# Altium PCB ModuMIDI.PcbDoc (part 1 of 2)
Units mil, origin at the board's own origin, x right, y up, seen from the top; angles counter-clockwise.
Board outline 9987.45 x 7920 mil, 2 copper layers (Top Layer, Bottom Layer), stack 62.19 mil thick; 170 components, 117 nets, 494 pads, 132 vias.
Unrouted connection lines stored in the file: 1.
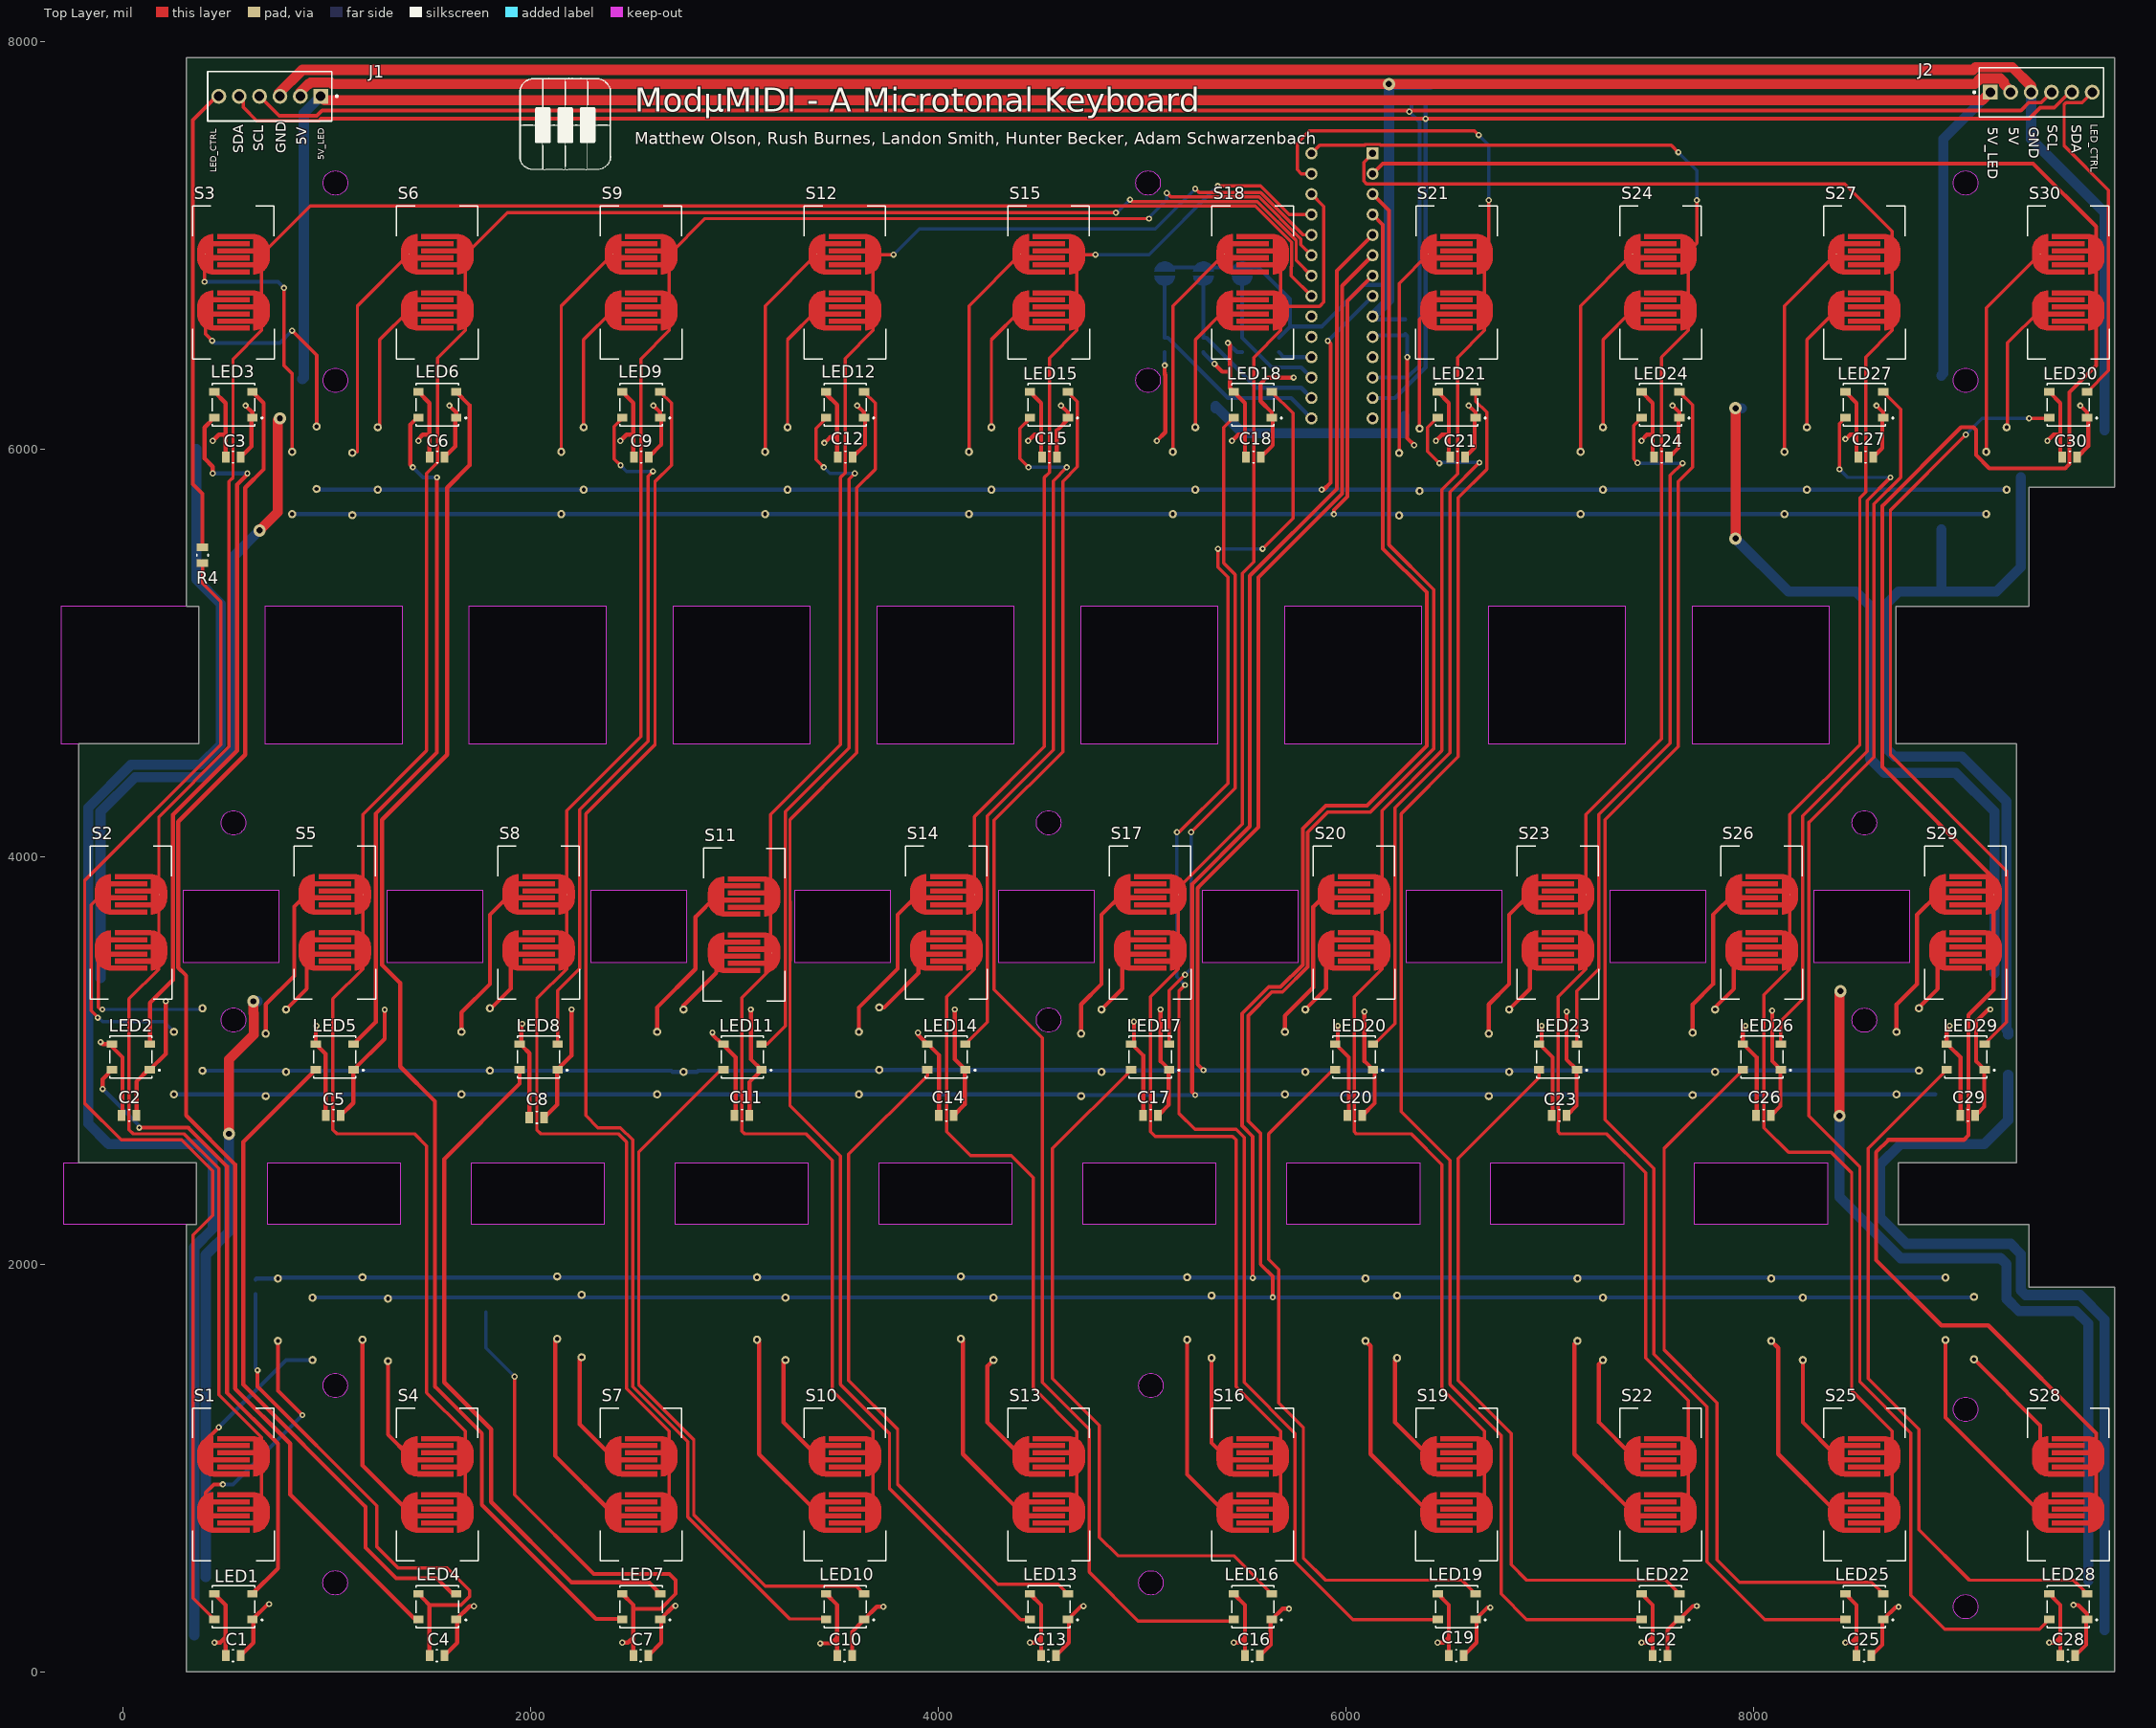
[diagram p0: Top Layer view]
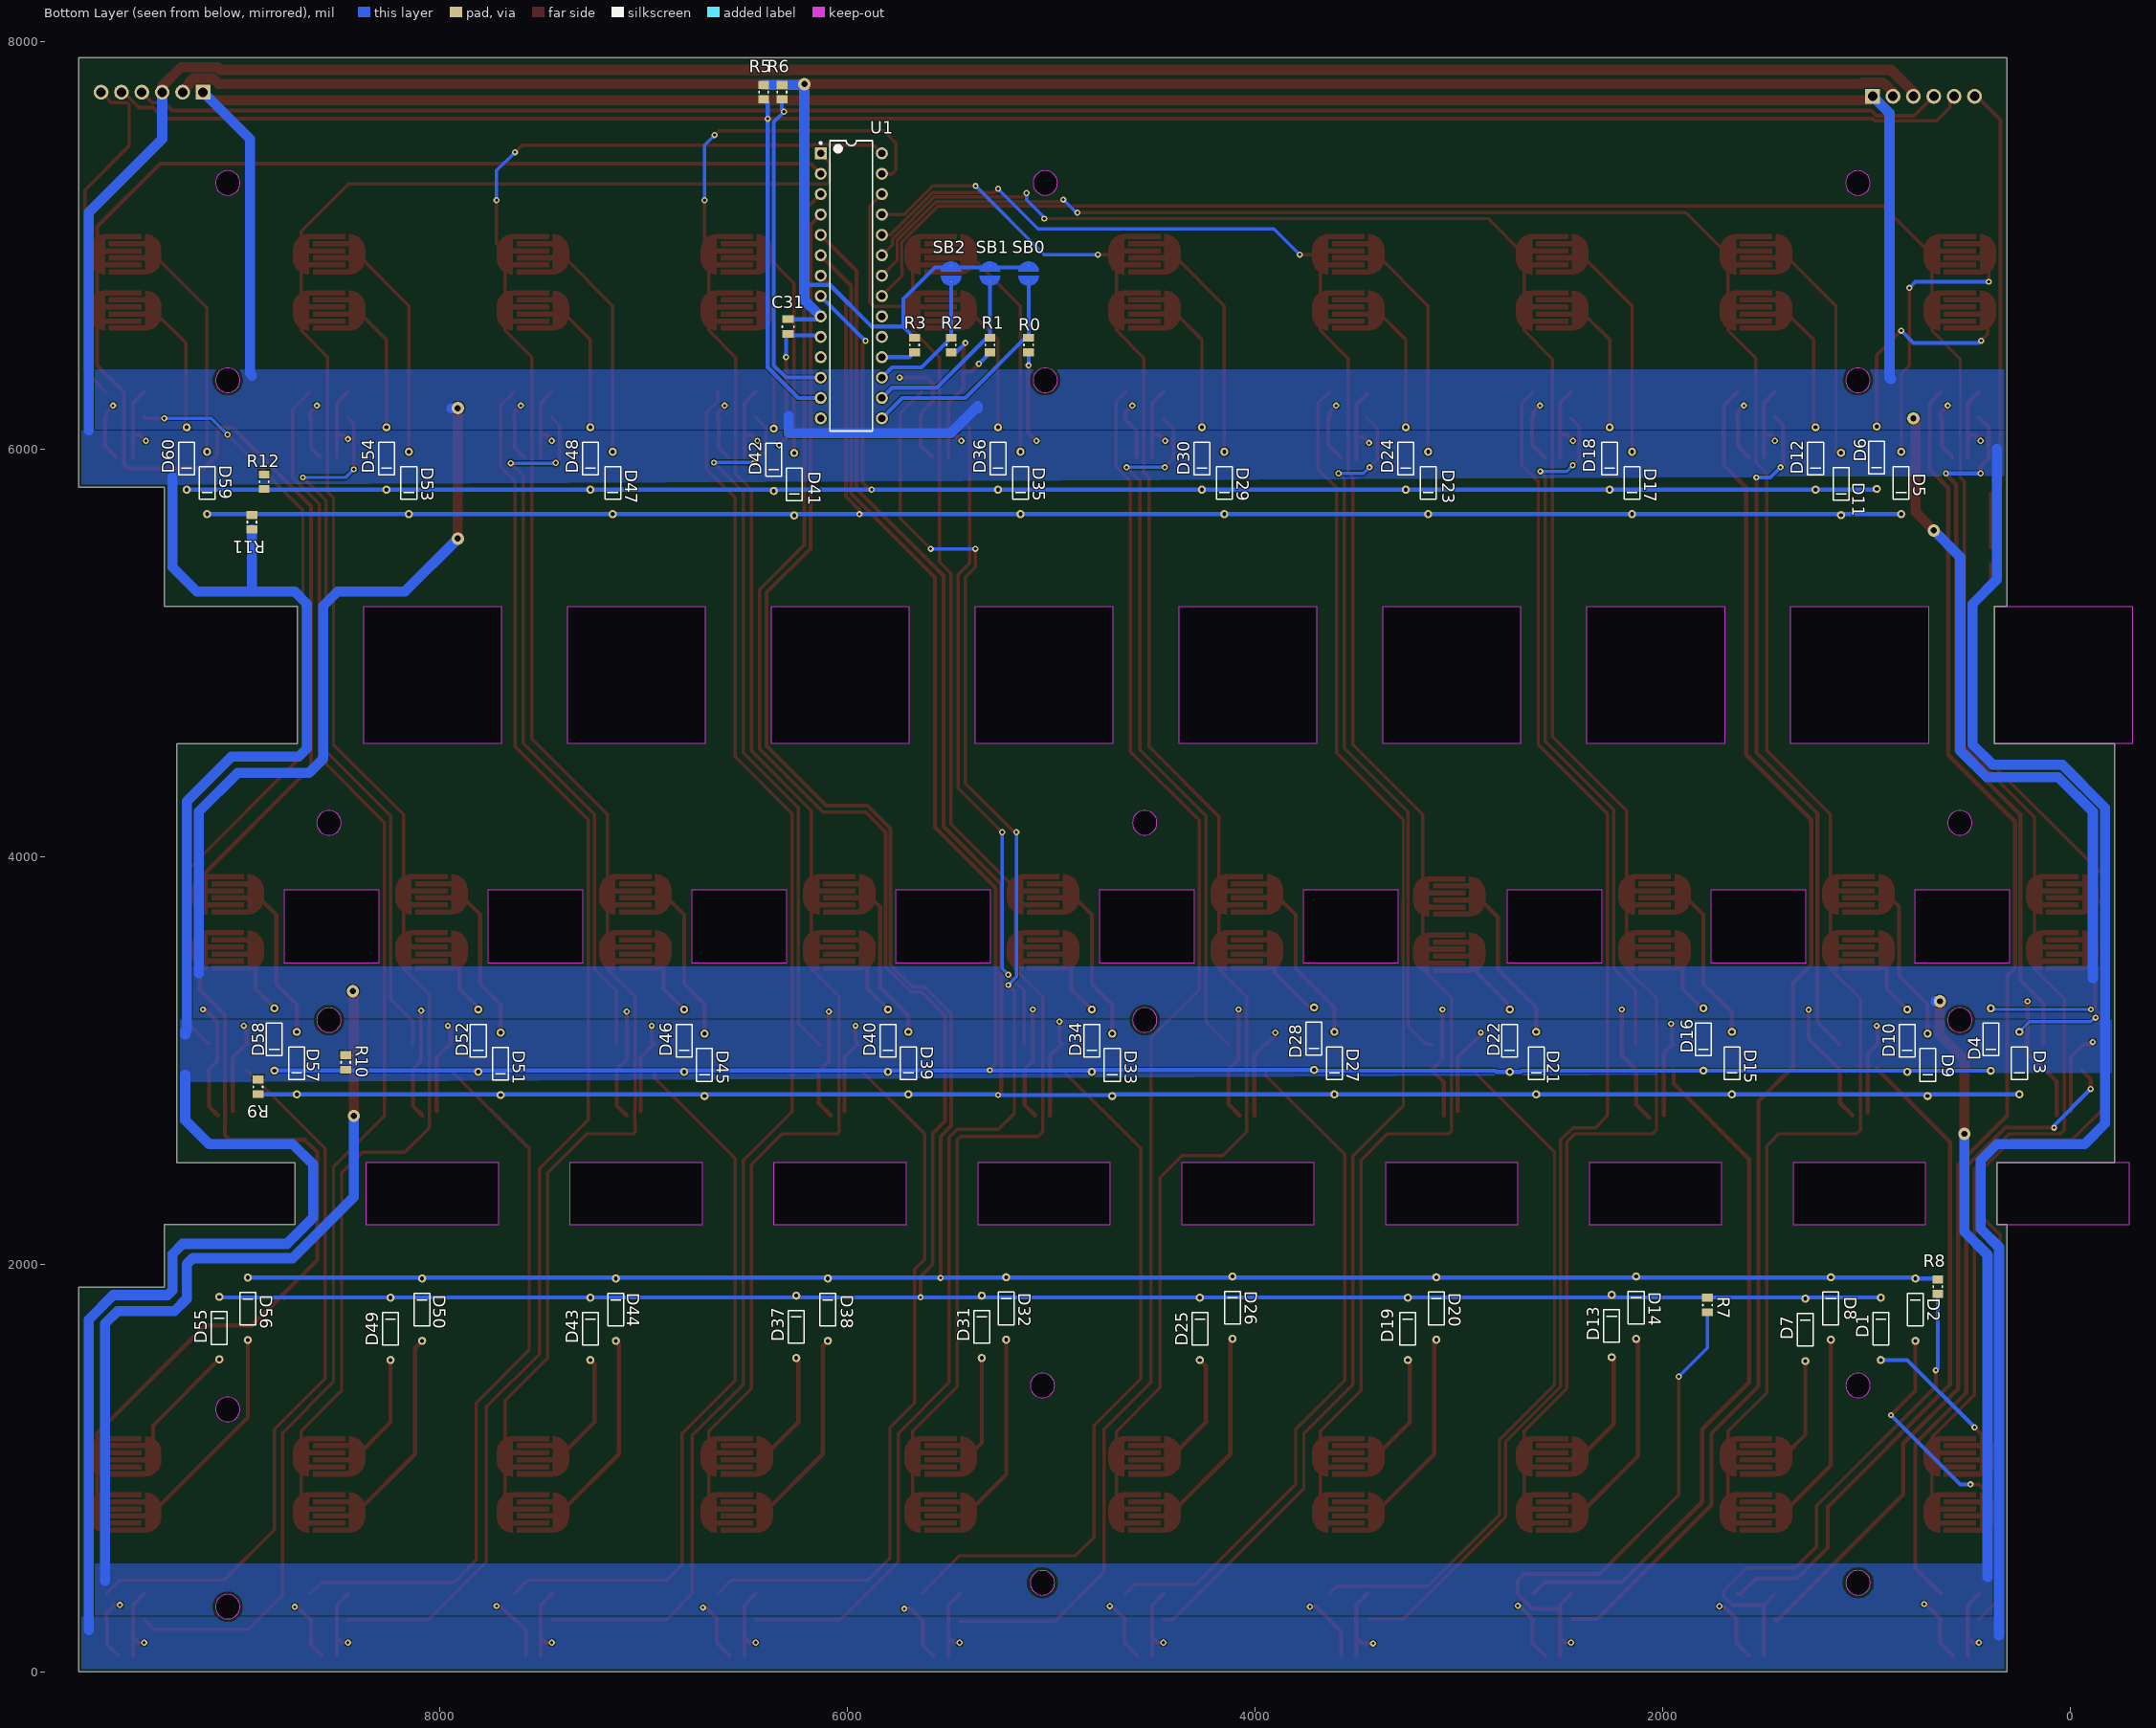
[diagram p1: Bottom Layer view, seen from below]
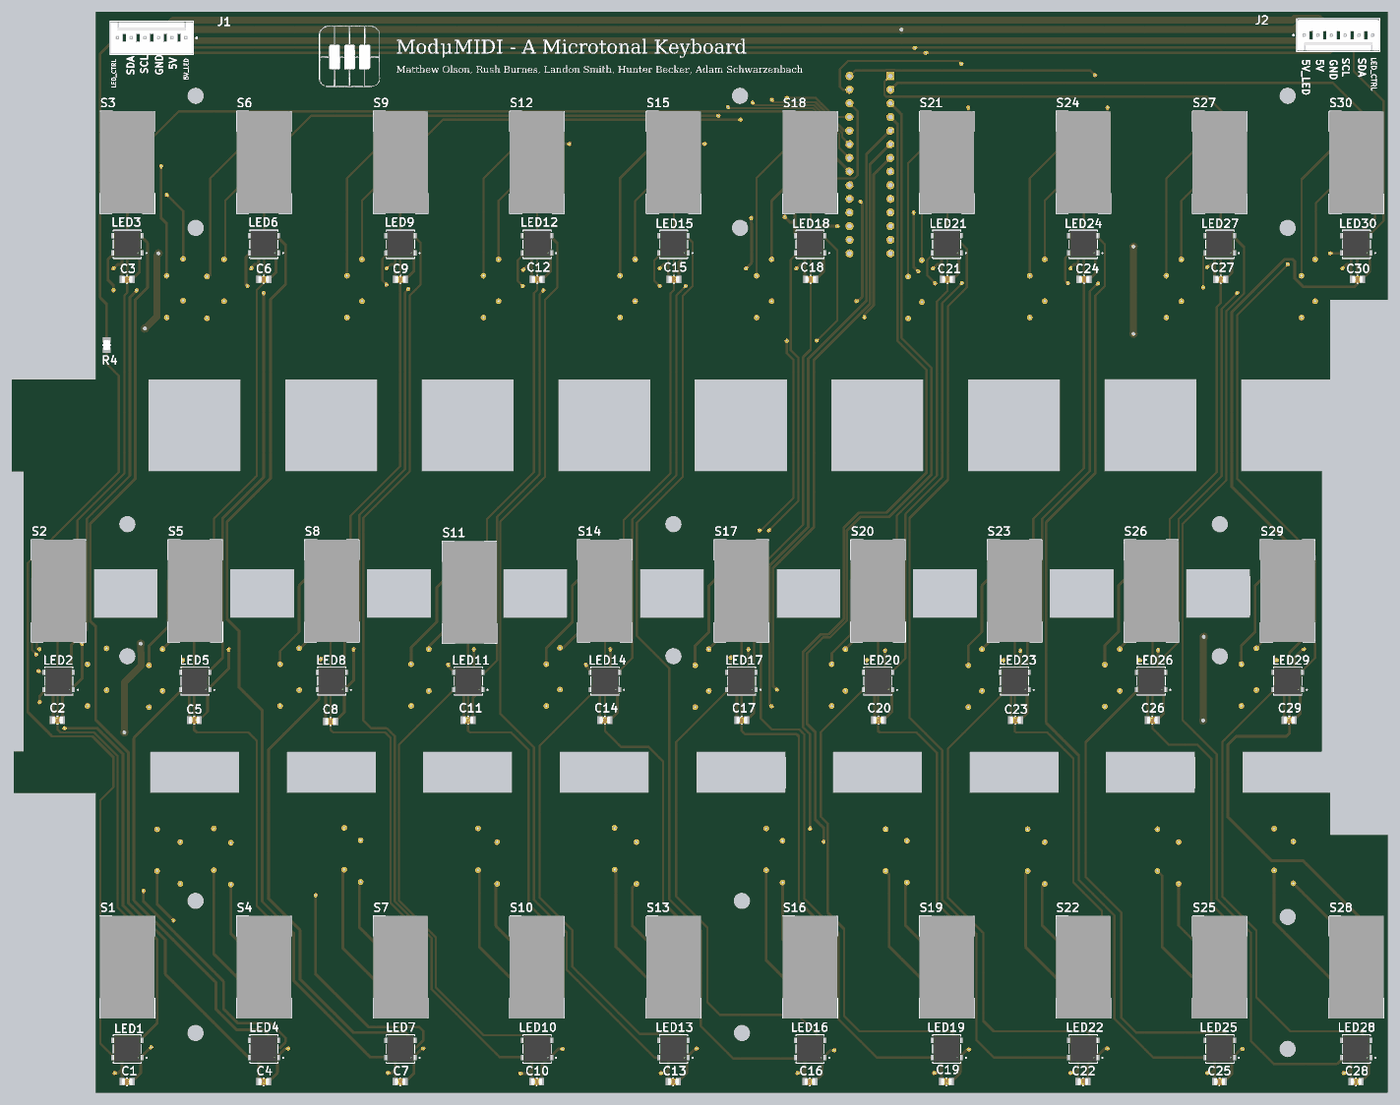
[diagram p3: 3D render of the assembled board from above, using the file's embedded part models]
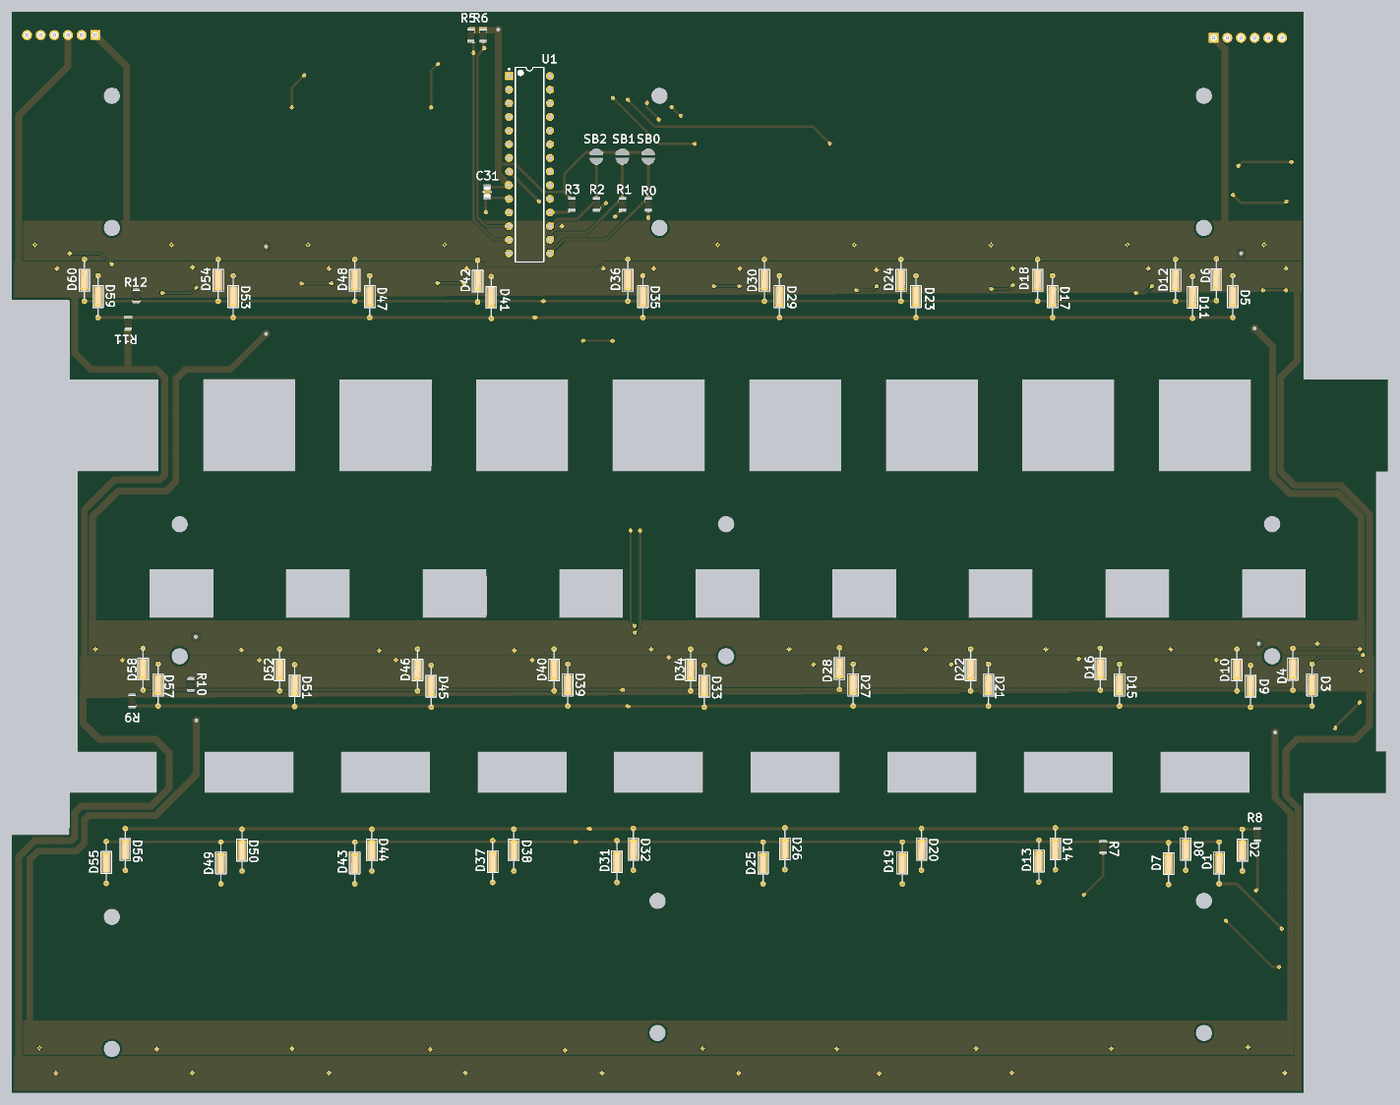
[diagram p4: 3D render of the assembled board from below, using the file's embedded part models]

## Layer stack, top to bottom
Top Solder: solder mask 0.4, Solder Resist, Dk 3.5
Top Layer: signal copper 1.4
Dielectric 1: dielectric 59.39, FR-4, Dk 4.8
Bottom Layer: signal copper 1.4
Bottom Solder: solder mask 0.4, Solder Resist, Dk 3.5

## Board outline
310,0 310,2196.22 360.5,2196.22 360.5,2497.73 -217.45,2497.73 -217.45,4553.07 370.92,4553.07 370.92,5227.72 310,5227.72 310,7920 9770,7920 9770,5811.33 9350.22,5811.33 9350.22,5227.72 8697.03,5227.72 8697.03,4553.07 9287.47,4553.07 9287.47,3876.48 9287.47,3282.69 9287.47,2497.73 8708.97,2497.73 8708.97,2196.22 9350.22,2196.22 9350.22,1888.68 9770,1888.68 9770,0
cut-out: 1041.06,377.11 cw(c1041.06,437.11) 981.06,437.11 cw(c1041.06,437.11) 1041.06,497.11 cw(c1041.06,437.11) 1101.06,437.11 cw(c1041.06,437.11)
cut-out: 1041.23,1344.89 cw(c1041.23,1404.89) 981.23,1404.89 cw(c1041.23,1404.89) 1041.23,1464.89 cw(c1041.23,1404.89) 1101.23,1404.89 cw(c1041.23,1404.89)
cut-out: 5042.38,1344.8 cw(c5042.38,1404.8) 4982.38,1404.8 cw(c5042.38,1404.8) 5042.38,1464.8 cw(c5042.38,1404.8) 5102.38,1404.8 cw(c5042.38,1404.8)
cut-out: 5042.38,377.01 cw(c5042.38,437.01) 4982.38,437.01 cw(c5042.38,437.01) 5042.38,497.01 cw(c5042.38,437.01) 5102.38,437.01 cw(c5042.38,437.01)
cut-out: 9038.92,260.13 cw(c9038.92,320.13) 8978.92,320.13 cw(c9038.92,320.13) 9038.92,380.13 cw(c9038.92,320.13) 9098.92,320.13 cw(c9038.92,320.13)
cut-out: 9038.92,1227.91 cw(c9038.92,1287.91) 8978.92,1287.91 cw(c9038.92,1287.91) 9038.92,1347.91 cw(c9038.92,1287.91) 9098.92,1287.91 cw(c9038.92,1287.91)
cut-out: 8542.01,4105.53 cw(c8542.01,4165.53) 8482.01,4165.53 cw(c8542.01,4165.53) 8542.01,4225.53 cw(c8542.01,4165.53) 8602.01,4165.53 cw(c8542.01,4165.53)
cut-out: 8542.01,3137.65 cw(c8542.01,3197.65) 8482.01,3197.65 cw(c8542.01,3197.65) 8542.01,3257.65 cw(c8542.01,3197.65) 8602.01,3197.65 cw(c8542.01,3197.65)
cut-out: 4540.58,4106.24 cw(c4540.58,4166.24) 4480.58,4166.24 cw(c4540.58,4166.24) 4540.58,4226.24 cw(c4540.58,4166.24) 4600.58,4166.24 cw(c4540.58,4166.24)
cut-out: 4540.58,3138.36 cw(c4540.58,3198.36) 4480.58,3198.36 cw(c4540.58,3198.36) 4540.58,3258.36 cw(c4540.58,3198.36) 4600.58,3198.36 cw(c4540.58,3198.36)
cut-out: 541.89,3137.97 cw(c541.89,3197.97) 481.89,3197.97 cw(c541.89,3197.97) 541.89,3257.97 cw(c541.89,3197.97) 601.89,3197.97 cw(c541.89,3197.97)
cut-out: 541.89,4105.84 cw(c541.89,4165.84) 481.89,4165.84 cw(c541.89,4165.84) 541.89,4225.84 cw(c541.89,4165.84) 601.89,4165.84 cw(c541.89,4165.84)
cut-out: 9038.71,7244.74 cw(c9038.71,7304.74) 8978.71,7304.74 cw(c9038.71,7304.74) 9038.71,7364.74 cw(c9038.71,7304.74) 9098.71,7304.74 cw(c9038.71,7304.74)
cut-out: 9038.71,6276.96 cw(c9038.71,6336.96) 8978.71,6336.96 cw(c9038.71,6336.96) 9038.71,6396.96 cw(c9038.71,6336.96) 9098.71,6336.96 cw(c9038.71,6336.96)
cut-out: 5028.38,6277.08 cw(c5028.38,6337.08) 4968.38,6337.08 cw(c5028.38,6337.08) 5028.38,6397.08 cw(c5028.38,6337.08) 5088.38,6337.08 cw(c5028.38,6337.08)
cut-out: 5028.38,7244.87 cw(c5028.38,7304.87) 4968.38,7304.87 cw(c5028.38,7304.87) 5028.38,7364.87 cw(c5028.38,7304.87) 5088.38,7304.87 cw(c5028.38,7304.87)
cut-out: 1042.02,6276.84 cw(c1042.02,6336.84) 982.02,6336.84 cw(c1042.02,6336.84) 1042.02,6396.84 cw(c1042.02,6336.84) 1102.02,6336.84 cw(c1042.02,6336.84)
cut-out: 1042.02,7244.72 cw(c1042.02,7304.72) 982.02,7304.72 cw(c1042.02,7304.72) 1042.02,7364.72 cw(c1042.02,7304.72) 1102.02,7304.72 cw(c1042.02,7304.72)
cut-out: -302.94,5227.36 -302.94,4553.48 370.93,4553.48 370.93,5227.57 -302.88,5227.57
cut-out: 4697.36,5227.36 4697.36,4553.48 5371.23,4553.48 5371.23,5227.57 4697.43,5227.57
cut-out: 4709.1,2497.65 5360.56,2497.65 5360.56,2196.23 4709.09,2196.23
cut-out: 5296.19,3834.87 5763.37,3834.87 5763.37,3479.07 5296.07,3479.07
cut-out: 5697.21,5227.01 5697.21,4553.13 6371.08,4553.13 6371.08,5227.22 5697.27,5227.22
cut-out: 5709.11,2497.69 6360.57,2497.69 6360.57,2196.27 5709.1,2196.27
cut-out: 6296.17,3834.92 6763.36,3834.92 6763.36,3479.12 6296.06,3479.12
cut-out: 6697.26,5227.36 6697.26,4553.48 7371.14,4553.48 7371.14,5227.57 6697.33,5227.57
cut-out: 6709.11,2497.67 7360.57,2497.67 7360.57,2196.25 6709.1,2196.25
cut-out: 7296.15,3834.88 7763.33,3834.88 7763.33,3479.09 7296.04,3479.09
cut-out: 7697.16,5228.01 7697.16,4554.13 8371.03,4554.13 8371.03,5228.22 7697.22,5228.22
cut-out: 7709.01,2497.71 8360.48,2497.71 8360.48,2196.29 7709,2196.29
cut-out: 8296.15,3834.91 8763.33,3834.91 8763.33,3479.11 8296.03,3479.11
cut-out: -290.99,2497.7 360.48,2497.7 360.48,2196.28 -291,2196.28
cut-out: 296.15,3834.88 763.33,3834.88 763.33,3479.09 296.03,3479.09
cut-out: 697.01,5227.41 697.01,4553.53 1370.88,4553.53 1370.88,5227.62 697.07,5227.62
cut-out: 709.01,2497.67 1360.47,2497.67 1360.47,2196.25 709,2196.25
cut-out: 1296.15,3835.06 1763.33,3835.06 1763.33,3479.27 1296.04,3479.27
cut-out: 1696.85,5227.06 1696.85,4553.18 2370.72,4553.18 2370.72,5227.27 1696.91,5227.27
cut-out: 1709.02,2497.71 2360.48,2497.71 2360.48,2196.29 1709.01,2196.29
cut-out: 2296.2,3835.07 2763.38,3835.07 2763.38,3479.28 2296.09,3479.28
cut-out: 2696.91,5227.42 2696.91,4553.54 3370.78,4553.54 3370.78,5227.63 2696.97,5227.63
cut-out: 2709.02,2497.69 3360.48,2497.69 3360.48,2196.27 2709.01,2196.27
cut-out: 3296.19,3834.84 3763.37,3834.84 3763.37,3479.05 3296.08,3479.05
cut-out: 3697.41,5227.31 3697.41,4553.43 4371.28,4553.43 4371.28,5227.52 3697.47,5227.52
cut-out: 3709.1,2497.68 4360.57,2497.68 4360.57,2196.25 3709.09,2196.25
cut-out: 4296.18,3834.79 4763.36,3834.79 4763.36,3479 4296.07,3479

## Design rules (kind name [scope] priority, off if disabled: settings)
BoardOutlineClearance [All] p1: gap=15 ignorepadtopadclearanceinfootprint=FALSE
Clearance [All] p1: gap=6 ignorepadtopadclearanceinfootprint=FALSE except(0: Arc-Hole Track-Hole SMDPad-Hole THPad-Hole Via-Hole Fill-Hole Poly-Hole Region-Hole Text-Hole)
ComponentClearance [All] p1: gap=1 collisioncheckmode=3 verticalgap=1 showdistances=FALSE
DiffPairsRouting [All] p1: maxlimit=393.7 minlimit=6 mostfreqgap=8 toplayer_minwidth=6 toplayer_maxwidth=15 toplayer_prefwidth=8 bottomlayer_minwidth=6 bottomlayer_maxwidth=15 bottomlayer_prefwidth=8 maxuncoupledlength=500
HoleSize [All] p1: absolutevalues=TRUE maxlimit=265 minlimit=13 maxpercent=80.000 minpercent=20.000
HoleToHoleClearance [All] p1: gap=10 allowstackedmicrovias=FALSE
MinimumAnnularRing [All] p1: minimumring=7
MinimumSolderMaskSliver [All] p1: minsoldermaskwidth=0
PlaneClearance [All] p1: clearance=10
PlaneConnect [All] p1: planeconnectstyle=Direct reliefexpansion=16 reliefentries=4 reliefconductorwidth=6 reliefairgap=6
PolygonConnect [All] p1: connectstyle=Relief reliefconductorwidth=8 reliefentries=4 polygonreliefangle="90 Angle" airgapwidth=6
RoomDefinition ModuMIDI_LEDs [InComponentClass('ModuMIDI_LEDs')] p1: confinementstyle=ConfineIn formatcopy=TRUE lockcomponents=FALSE outline -575.32,-0.25 1424.68,-0.25 1424.68,999.75 -575.32,999.75
RoomDefinition ModuMIDI_Keys [InComponentClass('ModuMIDI_Keys')] p2: confinementstyle=ConfineIn formatcopy=TRUE lockcomponents=FALSE outline -575.32,-0.25 1424.68,-0.25 1424.68,999.75 -575.32,999.75
RoomDefinition ModuMIDI_Connectors_GPIO [InComponentClass('ModuMIDI_Connectors_GPIO')] p3: confinementstyle=ConfineIn formatcopy=TRUE lockcomponents=FALSE outline 9814.68,69.75 11344.68,69.75 11344.68,269.75 9814.68,269.75
RoutingCorners [All] p1: cornerstyle=45-Degree minsetback=49.21 maxsetback=49.21
RoutingVias [All] p1: holewidth=15 width=30 viastyle="Through Hole" minholewidth=13 minwidth=27 maxholewidth=100 maxwidth=114
SilkToSilkClearance [All] p1: silktosilkclearance=0
SilkToSolderMaskClearance [IsPad] p1: minsilkscreentomaskgap=6 clearancetoexposedcopper=TRUE
SolderMaskExpansion [All] p1: expansion=2.95 istentingtop=FALSE
Width [All] p1: maxlimit=400 minlimit=6 preferedwidth=8
20 further rules are at their usual default settings.

## Classes and differential pairs
component class ModuMIDI_Keys: D1 D2 D3 D4 D5 D6 D7 D8 D9 D10 D11 D12 D13 D14 D15 D16 D17 D18 D19 D20 D21 D22 D23 D24 D25 D26 D27 D28 D29 D30 D31 D32 D33 D34 D35 D36 D37 D38 D39 D40 D41 D42 D43 D44 D45 D46 D47 D48 D49 D50 D51 D52 D53 D54 D55 D56 D57 D58 D59 D60 S1 S2 S3 S4 S5 S6 S7 S8 S9 S10 S11 S12 S13 S14 S15 S16 S17 S18 S19 S20 S21 S22 S23 S24 S25 S26 S27 S28 S29 S30
component class ModuMIDI_Connectors_GPIO: C31 J1 J2 R0 R1 R2 R3 R5 R6 R7 R8 R9 R10 R11 R12 SB0 SB1 SB2 U1
component class ModuMIDI_LEDs: C1 C2 C3 C4 C5 C6 C7 C8 C9 C10 C11 C12 C13 C14 C15 C16 C17 C18 C19 C20 C21 C22 C23 C24 C25 C26 C27 C28 C29 C30 LED1 LED2 LED3 LED4 LED5 LED6 LED7 LED8 LED9 LED10 LED11 LED12 LED13 LED14 LED15 LED16 LED17 LED18 LED19 LED20 LED21 LED22 LED23 LED24 LED25 LED26 LED27 LED28 LED29 LED30 R4

## Components (designator, comment, footprint, x,y, rotation, side; value= is the part's Value field where it differs from the comment)
C1 "1uF" FP-CC0805-0_85-MFG 540,80 r180 top locked value="1 uF"
C2 "1uF" FP-CC0805-0_85-MFG 30,2730 r180 top locked value="1 uF"
C3 "1uF" FP-CC0805-0_85-MFG 540,5960 r180 top locked value="1 uF"
C4 "1uF" FP-CC0805-0_85-MFG 1540,80 r180 top locked value="1 uF"
C5 "1uF" FP-CC0805-0_85-MFG 1032.22,2730 r180 top locked value="1 uF"
C6 "1uF" FP-CC0805-0_85-MFG 1541.11,5960 r180 top locked value="1 uF"
C7 "1uF" FP-CC0805-0_85-MFG 2540,80 r180 top locked value="1 uF"
C8 "1uF" FP-CC0805-0_85-MFG 2030,2720 r180 top value="1 uF"
C9 "1uF" FP-CC0805-0_85-MFG 2542.22,5960 r180 top locked value="1 uF"
C10 "1uF" FP-CC0805-0_85-MFG 3540,80 r180 top locked value="1 uF"
C11 "1uF" FP-CC0805-0_85-MFG 3036.67,2730 r180 top locked value="1 uF"
C12 "1uF" FP-CC0805-0_85-MFG 3543.33,5960 r180 top locked value="1 uF"
C13 "1uF" FP-CC0805-0_85-MFG 4540,80 r180 top locked value="1 uF"
C14 "1uF" FP-CC0805-0_85-MFG 4038.89,2730 r180 top locked value="1 uF"
C15 "1uF" FP-CC0805-0_85-MFG 4544.44,5960 r180 top locked value="1 uF"
C16 "1uF" FP-CC0805-0_85-MFG 5540,80 r180 top locked value="1 uF"
C17 "1uF" FP-CC0805-0_85-MFG 5041.11,2730 r180 top locked value="1 uF"
C18 "1uF" FP-CC0805-0_85-MFG 5545.56,5960 r180 top locked value="1 uF"
C19 "1uF" FP-CC0805-0_85-MFG 6540,80 r180 top locked value="1 uF"
C20 "1uF" FP-CC0805-0_85-MFG 6043.33,2730 r180 top locked value="1 uF"
C21 "1uF" FP-CC0805-0_85-MFG 6546.67,5960 r180 top locked value="1 uF"
C22 "1uF" FP-CC0805-0_85-MFG 7540,80 r180 top locked value="1 uF"
C23 "1uF" FP-CC0805-0_85-MFG 7045.56,2730 r180 top locked value="1 uF"
C24 "1uF" FP-CC0805-0_85-MFG 7547.78,5960 r180 top locked value="1 uF"
C25 "1uF" FP-CC0805-0_85-MFG 8540,80 r180 top locked value="1 uF"
C26 "1uF" FP-CC0805-0_85-MFG 8047.78,2730 r180 top locked value="1 uF"
C27 "1uF" FP-CC0805-0_85-MFG 8548.89,5960 r180 top locked value="1 uF"
C28 "1uF" FP-CC0805-0_85-MFG 9540,80 r180 top locked value="1 uF"
C29 "1uF" FP-CC0805-0_85-MFG 9050,2730 r180 top locked value="1 uF"
C30 "1uF" FP-CC0805-0_85-MFG 9550,5960 r180 top locked value="1 uF"
C31 "1uF" FP-CC0805-0_85-MFG 6290,6600 r270 bottom value="1 uF"
D1 "1N4148-T26A" DIODE_ZDO_DO-35_ONS 930,1836.18 r270 bottom
D2 "1N4148-T26A" DIODE_ZDO_DO-35_ONS 760,1930 r270 bottom
D3 "1N4148-T26A" DIODE_ZDO_DO-35_ONS 250,2833.82 r90 bottom
D4 "1N4148-T26A" DIODE_ZDO_DO-35_ONS 390,2949.48 r90 bottom
D5 "1N4148-T26A" DIODE_ZDO_DO-35_ONS 830,5680 r90 bottom
D6 "1N4148-T26A" DIODE_ZDO_DO-35_ONS 950,5803.82 r90 bottom
D7 "1N4148-T26A" DIODE_ZDO_DO-35_ONS 1300,1831.18 r270 bottom
D8 "1N4148-T26A" DIODE_ZDO_DO-35_ONS 1175,1936.18 r270 bottom
D9 "1N4148-T26A" DIODE_ZDO_DO-35_ONS 700,2825 r90 bottom
D10 "1N4148-T26A" DIODE_ZDO_DO-35_ONS 800,2943.82 r90 bottom
D11 "1N4148-T26A" DIODE_ZDO_DO-35_ONS 1125,5675 r90 bottom
D12 "1N4148-T26A" DIODE_ZDO_DO-35_ONS 1250,5800 r90 bottom
D13 "1N4148-T26A" DIODE_ZDO_DO-35_ONS 2250,1850 r270 bottom
D14 "1N4148-T26A" DIODE_ZDO_DO-35_ONS 2130,1940 r270 bottom
D15 "1N4148-T26A" DIODE_ZDO_DO-35_ONS 1660,2833.82 r90 bottom
D16 "1N4148-T26A" DIODE_ZDO_DO-35_ONS 1800,2950 r90 bottom
D17 "1N4148-T26A" DIODE_ZDO_DO-35_ONS 2150,5680 r90 bottom
D18 "1N4148-T26A" DIODE_ZDO_DO-35_ONS 2260,5800 r90 bottom
D19 "1N4148-T26A" DIODE_ZDO_DO-35_ONS 3250,1836.18 r270 bottom
D20 "1N4148-T26A" DIODE_ZDO_DO-35_ONS 3110,1936.18 r270 bottom
D21 "1N4148-T26A" DIODE_ZDO_DO-35_ONS 2620,2833.82 r90 bottom
D22 "1N4148-T26A" DIODE_ZDO_DO-35_ONS 2750,2943.82 r90 bottom
D23 "1N4148-T26A" DIODE_ZDO_DO-35_ONS 3150,5680 r90 bottom
D24 "1N4148-T26A" DIODE_ZDO_DO-35_ONS 3260,5800 r90 bottom
D25 "1N4148-T26A" DIODE_ZDO_DO-35_ONS 4270,1836.18 r270 bottom
D26 "1N4148-T26A" DIODE_ZDO_DO-35_ONS 4109.87,1940.34 r270 bottom
D27 "1N4148-T26A" DIODE_ZDO_DO-35_ONS 3610,2833.82 r90 bottom
D28 "1N4148-T26A" DIODE_ZDO_DO-35_ONS 3710,2953.82 r90 bottom
D29 "1N4148-T26A" DIODE_ZDO_DO-35_ONS 4150,5680 r90 bottom
D30 "1N4148-T26A" DIODE_ZDO_DO-35_ONS 4260,5800 r90 bottom
D31 "1N4148-T26A" DIODE_ZDO_DO-35_ONS 5340,1846.18 r270 bottom
D32 "1N4148-T26A" DIODE_ZDO_DO-35_ONS 5220,1936.18 r270 bottom
D33 "1N4148-T26A" DIODE_ZDO_DO-35_ONS 4700,2825 r90 bottom
D34 "1N4148-T26A" DIODE_ZDO_DO-35_ONS 4800,2943.82 r90 bottom
D35 "1N4148-T26A" DIODE_ZDO_DO-35_ONS 5150,5680 r90 bottom
D36 "1N4148-T26A" DIODE_ZDO_DO-35_ONS 5260,5800 r90 bottom
D37 "1N4148-T26A" DIODE_ZDO_DO-35_ONS 6250,1846.18 r270 bottom
D38 "1N4148-T26A" DIODE_ZDO_DO-35_ONS 6094.87,1930.34 r270 bottom
D39 "1N4148-T26A" DIODE_ZDO_DO-35_ONS 5700,2833.82 r90 bottom
D40 "1N4148-T26A" DIODE_ZDO_DO-35_ONS 5800,2943.82 r90 bottom
D41 "1N4148-T26A" DIODE_ZDO_DO-35_ONS 6260,5673.82 r90 bottom
D42 "1N4148-T26A" DIODE_ZDO_DO-35_ONS 6360,5793.82 r90 bottom
D43 "1N4148-T26A" DIODE_ZDO_DO-35_ONS 7260,1836.18 r270 bottom
D44 "1N4148-T26A" DIODE_ZDO_DO-35_ONS 7134.87,1930.34 r270 bottom
D45 "1N4148-T26A" DIODE_ZDO_DO-35_ONS 6700,2825 r90 bottom
D46 "1N4148-T26A" DIODE_ZDO_DO-35_ONS 6800,2943.82 r90 bottom
D47 "1N4148-T26A" DIODE_ZDO_DO-35_ONS 7150,5680 r90 bottom
D48 "1N4148-T26A" DIODE_ZDO_DO-35_ONS 7260,5800 r90 bottom
D49 "1N4148-T26A" DIODE_ZDO_DO-35_ONS 8240,1836.18 r270 bottom
D50 "1N4148-T26A" DIODE_ZDO_DO-35_ONS 8085.32,1930.25 r270 bottom
D51 "1N4148-T26A" DIODE_ZDO_DO-35_ONS 7700,2830 r90 bottom
D52 "1N4148-T26A" DIODE_ZDO_DO-35_ONS 7810,2943.82 r90 bottom
D53 "1N4148-T26A" DIODE_ZDO_DO-35_ONS 8150,5680 r90 bottom
D54 "1N4148-T26A" DIODE_ZDO_DO-35_ONS 8260,5800 r90 bottom
D55 "1N4148-T26A" DIODE_ZDO_DO-35_ONS 9080,1840 r270 bottom
D56 "1N4148-T26A" DIODE_ZDO_DO-35_ONS 8940,1934.63 r270 bottom
D57 "1N4148-T26A" DIODE_ZDO_DO-35_ONS 8700,2833.77 r90 bottom
D58 "1N4148-T26A" DIODE_ZDO_DO-35_ONS 8810,2950 r90 bottom
D59 "1N4148-T26A" DIODE_ZDO_DO-35_ONS 9140,5680 r90 bottom
D60 "1N4148-T26A" DIODE_ZDO_DO-35_ONS 9240,5800 r90 bottom
J1 "22-27-2061" FP-22-27-2061-MFG 720,7730 r180 top
J2 "22-27-2061" FP-22-27-2061-MFG 9410,7750 r0 top
LED1 "IN-PI55TATPRPGPB" LED_IN-PI55TAT_INL 542,320 r180 top locked
LED2 "IN-PI55TATPRPGPB" LED_IN-PI55TAT_INL 39,3017 r180 top locked
LED3 "IN-PI55TATPRPGPB" LED_IN-PI55TAT_INL 542,6217 r180 top locked
LED4 "IN-PI55TATPRPGPB" LED_IN-PI55TAT_INL 1542,320 r180 top locked
LED5 "IN-PI55TATPRPGPB" LED_IN-PI55TAT_INL 1039,3017 r180 top locked
LED6 "IN-PI55TATPRPGPB" LED_IN-PI55TAT_INL 1542,6217 r180 top locked
LED7 "IN-PI55TATPRPGPB" LED_IN-PI55TAT_INL 2542,320 r180 top locked
LED8 "IN-PI55TATPRPGPB" LED_IN-PI55TAT_INL 2039,3017 r180 top locked
LED9 "IN-PI55TATPRPGPB" LED_IN-PI55TAT_INL 2542,6217 r180 top locked
LED10 "IN-PI55TATPRPGPB" LED_IN-PI55TAT_INL 3542,320 r180 top locked
LED11 "IN-PI55TATPRPGPB" LED_IN-PI55TAT_INL 3039,3017 r180 top locked
LED12 "IN-PI55TATPRPGPB" LED_IN-PI55TAT_INL 3542,6217 r180 top locked
LED13 "IN-PI55TATPRPGPB" LED_IN-PI55TAT_INL 4542,320 r180 top locked
LED14 "IN-PI55TATPRPGPB" LED_IN-PI55TAT_INL 4039,3017 r180 top locked
LED15 "IN-PI55TATPRPGPB" LED_IN-PI55TAT_INL 4542,6217 r180 top locked
LED16 "IN-PI55TATPRPGPB" LED_IN-PI55TAT_INL 5542,320 r180 top locked
LED17 "IN-PI55TATPRPGPB" LED_IN-PI55TAT_INL 5039,3017 r180 top locked
LED18 "IN-PI55TATPRPGPB" LED_IN-PI55TAT_INL 5542,6217 r180 top locked
LED19 "IN-PI55TATPRPGPB" LED_IN-PI55TAT_INL 6542,320 r180 top locked
LED20 "IN-PI55TATPRPGPB" LED_IN-PI55TAT_INL 6039,3017 r180 top locked
LED21 "IN-PI55TATPRPGPB" LED_IN-PI55TAT_INL 6542,6217 r180 top locked
LED22 "IN-PI55TATPRPGPB" LED_IN-PI55TAT_INL 7542,320 r180 top locked
LED23 "IN-PI55TATPRPGPB" LED_IN-PI55TAT_INL 7039,3017 r180 top locked
LED24 "IN-PI55TATPRPGPB" LED_IN-PI55TAT_INL 7542,6217 r180 top locked
LED25 "IN-PI55TATPRPGPB" LED_IN-PI55TAT_INL 8542,320 r180 top locked
LED26 "IN-PI55TATPRPGPB" LED_IN-PI55TAT_INL 8039,3017 r180 top locked
LED27 "IN-PI55TATPRPGPB" LED_IN-PI55TAT_INL 8542,6217 r180 top locked
LED28 "IN-PI55TATPRPGPB" LED_IN-PI55TAT_INL 9542,320 r180 top locked
LED29 "IN-PI55TATPRPGPB" LED_IN-PI55TAT_INL 9039,3017 r180 top locked
LED30 "IN-PI55TATPRPGPB" LED_IN-PI55TAT_INL 9542,6217 r180 top locked
R0 "10k" RESC2013X60X35NL10T20 5110,6510 r90 bottom
R1 "10k" RESC2013X60X35NL10T20 5300,6510 r90 bottom
R2 "10k" RESC2013X60X35NL10T20 5490,6510 r90 bottom
R3 "10k" RESC2013X60X35NL10T20 5670,6510 r90 bottom
R4 "220R" FP-CRCW0805-e3-MFG 390,5478.39 r270 top
R5 "10k" RESC2013X60X35NL10T20 6410,7750 r90 bottom
R6 "10k" RESC2013X60X35NL10T20 6320,7750 r90 bottom
R7 "10k" RESC2013X60X35NL10T20 1780,1800 r90 bottom
R8 "10k" RESC2013X60X35NL10T20 650,1890 r90 bottom
R9 "10k" RESC2013X60X35NL10T20 8890,2870 r270 bottom
R10 "10k" RESC2013X60X35NL10T20 8460,2990 r270 bottom
R11 "10k" RESC2013X60X35NL10T20 8920,5640 r90 bottom
R12 "10k" RESC2013X60X35NL10T20 8860,5839 r270 bottom
S1 "Button_Symbol" MODUMIDI_BUTTON_FOOTPRINT 542,920 r0 top locked
S2 "Button_Symbol" MODUMIDI_BUTTON_FOOTPRINT 39,3677 r0 top locked
S3 "Button_Symbol" MODUMIDI_BUTTON_FOOTPRINT 542,6817 r0 top locked
S4 "Button_Symbol" MODUMIDI_BUTTON_FOOTPRINT 1542,920 r0 top locked
S5 "Button_Symbol" MODUMIDI_BUTTON_FOOTPRINT 1039,3677 r0 top locked
S6 "Button_Symbol" MODUMIDI_BUTTON_FOOTPRINT 1542,6817 r0 top locked
S7 "Button_Symbol" MODUMIDI_BUTTON_FOOTPRINT 2542,920 r0 top locked
S8 "Button_Symbol" MODUMIDI_BUTTON_FOOTPRINT 2039,3677 r0 top locked
S9 "Button_Symbol" MODUMIDI_BUTTON_FOOTPRINT 2542,6817 r0 top locked
S10 "Button_Symbol" MODUMIDI_BUTTON_FOOTPRINT 3542,920 r0 top locked
S11 "Button_Symbol" MODUMIDI_BUTTON_FOOTPRINT 3047.17,3666.32 r0 top locked
S12 "Button_Symbol" MODUMIDI_BUTTON_FOOTPRINT 3542,6817 r0 top locked
S13 "Button_Symbol" MODUMIDI_BUTTON_FOOTPRINT 4542,920 r0 top locked
S14 "Button_Symbol" MODUMIDI_BUTTON_FOOTPRINT 4039,3677 r0 top locked
S15 "Button_Symbol" MODUMIDI_BUTTON_FOOTPRINT 4542,6817 r0 top locked
S16 "Button_Symbol" MODUMIDI_BUTTON_FOOTPRINT 5542,920 r0 top locked
S17 "Button_Symbol" MODUMIDI_BUTTON_FOOTPRINT 5039,3677 r0 top locked
S18 "Button_Symbol" MODUMIDI_BUTTON_FOOTPRINT 5542,6817 r0 top locked
S19 "Button_Symbol" MODUMIDI_BUTTON_FOOTPRINT 6542,920 r0 top locked
S20 "Button_Symbol" MODUMIDI_BUTTON_FOOTPRINT 6039,3677 r0 top locked
S21 "Button_Symbol" MODUMIDI_BUTTON_FOOTPRINT 6542,6817 r0 top locked
S22 "Button_Symbol" MODUMIDI_BUTTON_FOOTPRINT 7542,920 r0 top locked
S23 "Button_Symbol" MODUMIDI_BUTTON_FOOTPRINT 7039,3677 r0 top locked
S24 "Button_Symbol" MODUMIDI_BUTTON_FOOTPRINT 7542,6817 r0 top locked
S25 "Button_Symbol" MODUMIDI_BUTTON_FOOTPRINT 8542,920 r0 top locked
S26 "Button_Symbol" MODUMIDI_BUTTON_FOOTPRINT 8039,3677 r0 top locked
S27 "Button_Symbol" ModuMIDI_Button_Footprint 8542,6817 r0 top locked
S28 "Button_Symbol" MODUMIDI_BUTTON_FOOTPRINT 9542,920 r0 top locked
S29 "Button_Symbol" MODUMIDI_BUTTON_FOOTPRINT 9039,3677 r0 top locked
S30 "Button_Symbol" MODUMIDI_BUTTON_FOOTPRINT 9542,6817 r0 top locked
SB0 "Solder_Bridge_Open" PCBComponent_1 5100,6850 r90 bottom net-tie
SB1 "Solder_Bridge_Open" PCBComponent_1 5290,6850 r90 bottom net-tie
SB2 "Solder_Bridge_Open" PCBComponent_1 5480,6850 r90 bottom net-tie
U1 "MCP23017-E/SP" SPDIP300-SP28 5980,6800 r180 bottom

## Footprints (in the part's own frame and the unit in brackets; to place one, negate y for a bottom-side part, rotate by r counter-clockwise, add the part's x,y. Pads: shape width x height; smd on the part's side, far side on the other; paste and mask are expansions set on the pad)
DIODE_ZDO_DO-35_ONS [mil]
  round 40 hole 20 mask+0: 1(0,0) 2(306.18,0)
  silkscreen extent 73,-39 233,39, body extent -5,-34 311,34, height 68
FP-22-27-2061-MFG [mm]
  rect 1.84x1.84 hole 1.19 paste-1000 mask+0: 1(-6.35,0)
  round 1.84 hole 1.19 paste-1000 mask+0: 2(-3.81,0) 3(-1.27,0) 4(1.27,0) 5(3.81,0) 6(6.35,0)
  silkscreen extent -8.47,-3.08 7.75,3.08, body extent -7.85,-3.18 7.85,3.17, height 0.25
FP-CC0805-0_85-MFG [mm]
  rect 0.95x1.4 smd paste+0 mask+0: 1(-0.925,0) 2(0.925,0)
  silkscreen extent -0.08,-0.72 0.08,0.72, body extent -1.6,-1.05 1.6,1.05, height 0.25
FP-CRCW0805-e3-MFG [mm]
  rect 0.95x1.45 smd paste+0 mask+0: 1(-0.975,0) 2(0.975,0)
  silkscreen extent -0.13,-0.7 0.13,0.7, body extent -1.55,-0.82 1.55,0.82, height 0.25
LED_IN-PI55TAT_INL [mil]
  rect 51x37 smd paste+0 mask+0: 1(-93,62.99) 2(-93,-62.99) 3(93,-62.99) 4(93,62.99)
  silkscreen extent -144,-104 104,104, body extent -106,-99 106,99, height 63
MODUMIDI_BUTTON_FOOTPRINT [mil]
  round 1 smd: 0(-137.17,139.37) 1(137.17,136.22) 2(-137.17,-136.22) 3(137.17,-139.37)
  Top Layer region: -98.43,62.99 -98.43,108.66 78.74,108.66 78.74,132.28 -98.43,132.28 -98.43,177.95 78.74,177.95 78.74,201.57 -98.43,201.57 -98.43,236.22 -128.56,230.23 -154.1,213.16 -171.17,187.61 -177.17,157.48 -177.17,157.48 -177.17,118.11 -171.17,87.98 -154.1,62.43 -128.56,45.36 -98.43,39.37 -98.43,39.37 78.74,39.37 78.74,62.99
  Top Layer region: 98.43,212.6 98.43,166.93 -78.74,166.93 -78.74,143.31 98.43,143.31 98.43,97.64 -78.74,97.64 -78.74,74.02 98.43,74.02 98.43,39.37 128.56,45.36 154.1,62.43 171.17,87.98 177.17,118.11 177.17,118.11 177.17,157.48 171.17,187.61 154.1,213.16 128.56,230.23 98.43,236.22 98.43,236.22 -78.74,236.22 -78.74,212.6
  Top Layer region: 98.43,-62.99 98.43,-108.66 -78.74,-108.66 -78.74,-132.28 98.43,-132.28 98.43,-177.95 -78.74,-177.95 -78.74,-201.57 98.43,-201.57 98.43,-236.22 128.56,-230.23 154.1,-213.16 171.17,-187.61 177.17,-157.48 177.17,-157.48 177.17,-118.11 171.17,-87.98 154.1,-62.43 128.56,-45.36 98.43,-39.37 98.43,-39.37 -78.74,-39.37 -78.74,-62.99
  Top Layer region: -98.43,-212.6 -98.43,-166.93 78.74,-166.93 78.74,-143.31 -98.43,-143.31 -98.43,-97.64 78.74,-97.64 78.74,-74.02 -98.43,-74.02 -98.43,-39.37 -128.56,-45.36 -154.1,-62.43 -171.17,-87.98 -177.17,-118.11 -177.17,-118.11 -177.17,-157.48 -171.17,-187.61 -154.1,-213.16 -128.56,-230.23 -98.43,-236.22 -98.43,-236.22 78.74,-236.22 78.74,-212.6
  silkscreen extent -200,-375 201,375, body extent -200,-375 200,375, height 438
ModuMIDI_Button_Footprint [mil]
  round 1 smd: 0(-137.17,139.37) 1(137.17,136.22) 2(-137.17,-136.22) 3(137.17,-139.37)
  Top Layer region: -98.43,62.99 -98.43,108.66 78.74,108.66 78.74,132.28 -98.43,132.28 -98.43,177.95 78.74,177.95 78.74,201.57 -98.43,201.57 -98.43,236.22 -128.56,230.23 -154.1,213.16 -171.17,187.61 -177.17,157.48 -177.17,157.48 -177.17,118.11 -171.17,87.98 -154.1,62.43 -128.56,45.36 -98.43,39.37 -98.43,39.37 78.74,39.37 78.74,62.99
  Top Layer region: 98.43,212.6 98.43,166.93 -78.74,166.93 -78.74,143.31 98.43,143.31 98.43,97.64 -78.74,97.64 -78.74,74.02 98.43,74.02 98.43,39.37 128.56,45.36 154.1,62.43 171.17,87.98 177.17,118.11 177.17,118.11 177.17,157.48 171.17,187.61 154.1,213.16 128.56,230.23 98.43,236.22 98.43,236.22 -78.74,236.22 -78.74,212.6
  Top Layer region: 98.43,-62.99 98.43,-108.66 -78.74,-108.66 -78.74,-132.28 98.43,-132.28 98.43,-177.95 -78.74,-177.95 -78.74,-201.57 98.43,-201.57 98.43,-236.22 128.56,-230.23 154.1,-213.16 171.17,-187.61 177.17,-157.48 177.17,-157.48 177.17,-118.11 171.17,-87.98 154.1,-62.43 128.56,-45.36 98.43,-39.37 98.43,-39.37 -78.74,-39.37 -78.74,-62.99
  Top Layer region: -98.43,-212.6 -98.43,-166.93 78.74,-166.93 78.74,-143.31 -98.43,-143.31 -98.43,-97.64 78.74,-97.64 78.74,-74.02 -98.43,-74.02 -98.43,-39.37 -128.56,-45.36 -154.1,-62.43 -171.17,-87.98 -177.17,-118.11 -177.17,-118.11 -177.17,-157.48 -171.17,-187.61 -154.1,-213.16 -128.56,-230.23 -98.43,-236.22 -98.43,-236.22 78.74,-236.22 78.74,-212.6
  silkscreen extent -200,-375 201,375, body extent -200,-375 200,375, height 438
PCBComponent_1 [mil]
  round 1 smd: 1(-30,10) 2(50,10)
  Top Layer region: 70,10 66.19,-9.13 55.36,-25.36 39.13,-36.19 20,-40 20,-40 20,60 39.13,56.19 55.36,45.36 66.19,29.13 70,10
  Top Layer region: -50,10 -46.19,29.13 -35.36,45.36 -19.13,56.19 0,60 0,60 0,-40 -19.13,-36.19 -35.36,-25.36 -46.19,-9.13 -50,10
RESC2013X60X35NL10T20 [mm] "Chip Resistor, 2-Leads, Body 2.1x1.35mm, IPC Medium Density"
  rect 1x1.35 smd: 1(-0.9,0) 2(0.9,0)
  silkscreen extent -0.1,-0.58 0.1,0.58, body extent -1.05,-0.68 1.05,0.67, height 0.6
SPDIP300-SP28 [mm] "DIP, 28-Pin, Row Spacing 7.62 mm, Pitch 2.54 mm"
  rect 1.5x1.5 hole 0.9: 1(-3.81,16.51)
  round 1.5 hole 0.9: 2(-3.81,13.97) 3(-3.81,11.43) 4(-3.81,8.89) 5(-3.81,6.35) 6(-3.81,3.81) 7(-3.81,1.27) 8(-3.81,-1.27) 9(-3.81,-3.81) 10(-3.81,-6.35) 11(-3.81,-8.89) 12(-3.81,-11.43) 13(-3.81,-13.97) 14(-3.81,-16.51) 15(3.81,-16.51) 16(3.81,-13.97) 17(3.81,-11.43) 18(3.81,-8.89) 19(3.81,-6.35) 20(3.81,-3.81) 21(3.81,-1.27) 22(3.81,1.27) 23(3.81,3.81) 24(3.81,6.35) 25(3.81,8.89) 26(3.81,11.43) 27(3.81,13.97) 28(3.81,16.51)
  silkscreen extent -3.94,-18.1 2.65,18.1, body extent -3.55,-18.1 3.55,18.1, height 5.33

## Part data
C1 C2 C3 C4 C5 C6 C7 C8 C9 C10 C11 C12 C13 C14 C15 C16 C17 C18 C19 C20 C21 C22 C23 C24 C25 C26 C27 C28 C29 C30 C31: library part CMP-03422-000182-1, "CAP CER 1UF 10V X7R 0805", Capacitance="1 uF", Manufacturer=Yageo, Manufacturer Part Number=CC0805KKX7R6BB105, Package=CC0805-0.85, Temperature="-30°C to +85°C", Temperature Characteristic=X7R, Temperature Range High=+85°C, Temperature Range Low=-30°C, Tolerance=0.1, Voltage Rating="10 V", Automotive=No, Category=Cap, ComponentLink2Description=Datasheet, ComponentLink2URL=http://www.yageo.com/documents/recent/UPY-GPHC_Y5V_6.3V-to-50V_8.pdf, Device Class L1="Passive Components", Device Class L2=Capacitors, Device Class L3="Ceramic Capacitors", Digikey Description="CAP CER 1UF 10V X7R 0805", Footprint Url=http://www.yageo.com/exep/pages/download/literatures/UPY-C_GEN_24.pdf, Height=0.95mm, Ipc Land Pattern Name=CAPC200125X85, Lead Free=Yes, Material=Ceramic, Mouser Description="Multilayer Ceramic Capacitors MLCC - SMD/SMT 1.0uF 10V X7R 10%", Octopart=https://octopart.com/cc0805kkx7r6bb105-yageo-42522859, PN=CC0805KKX7R6BB105, RoHS=TRUE
D1 D2 D3 D4 D5 D6 D7 D8 D9 D10 D11 D12 D13 D14 D15 D16 D17 D18 D19 D20 D21 D22 D23 D24 D25 D26 D27 D28 D29 D30 D31 D32 D33 D34 D35 D36 D37 D38 D39 D40 D41 D42 D43 D44 D45 D46 D47 D48 D49 D50 D51 D52 D53 D54 D55 D56 D57 D58 D59 D60: "DIODE GEN PURP 100V 200MA DO35", Mfr_Name=onsemi, Copyright="Copyright (C) 2023 Ultra Librarian. All rights reserved.", PN=1N4148-T26A, RefDes=RefDes, Type=DEV
J1 J2: library part CMP-04776-000309-1, "CONN HEADER VERT 6POS 2.54MM", Color=Natural, Contact Resistance=10mR, Current Rating=4A, Flammability Rating="UL94 V-0", Housing Color=White, Max Operating Temperature=75°C, Max Voltage Rating (AC)=250V, Min Operating Temperature=0°C, Package Quantity=10000, Connector Type="Male Pin", Contact Material=Brass, Contact Mating Length=0.295inch, Contact Plating=Tin, Contact Type="Male Pin", Depth=5.8mm, Fastening Type=Friction, Gender=Male, Hole Diameter=1.02mm, Housing Material=Nylon, Lead Pitch=2.54mm, Length=15.24mm, Material=Nylon, Max Current Rating=4A, Mount="Through Hole", Number of Contacts=6, Number of Positions=6, Number of Rows=1, Orientation=Straight, Packaging=Bulk, Pitch=2.54mm, Radiation Hardening=No, REACH SVHC="No SVHC", Series=KK, Termination=Solder, Voltage Rating=250V, Voltage Rating (AC)=250V, Working Voltage=250V
LED1 LED2 LED3 LED4 LED5 LED6 LED7 LED8 LED9 LED10 LED11 LED12 LED13 LED14 LED15 LED16 LED17 LED18 LED19 LED20 LED21 LED22 LED23 LED24 LED25 LED26 LED27 LED28 LED29 LED30: "No Description Available", Mfr_Name=Inolux, PN=IN-PI55TATPRPGPB, RefDes=RefDes, Type=Type
R0 R1 R2 R3: library part CMP-1659-00013-4, "Chip Resistor, 10 KOhm, +/- 1%, 0.125 W, -55 to 155 degC, 0805 (2012 Metric), RoHS, Tape and Reel / RC0805FR-0710KL", Manufacturer=Yageo, Max Operating Temperature="155 degC", Min Operating Temperature="-55 degC", Package Quantity=5000, Voltage Rating="150 V", ComponentLink1Description="Manufacturer URL", ComponentLink1URL=http://www.yageo.com/, ComponentLink2Description=Datasheet, ComponentLink2URL=http://www.yageo.com/documents/recent/PYu-RC_Group_51_RoHS_L_04.pdf, DatasheetVersion="Rev. 4, 02/2016", Height="0.5 mm", Length="2 mm", Mount="Surface Mount", Mounting Technology="Surface Mount", PackageDescription="2-Pin Surface Mounted Device, Body 2 x 1.25 mm", PackageReference=0805, Packaging="Tape and Reel", Pins=2, PN=RC0805FR-0710KL, REACH SVHC="No SVHC", RoHSCompliant=true
R4: library part CMP-2001-03682-2, "RES Thick Film, 220Ω, 1%, 0.125W, 100ppm/°C, 0805", Case Code (Imperial)=0805, Case Code (Metric)=2012, Max Operating Temperature=155°C, Max Power Dissipation=125mW, Min Operating Temperature=-55°C, Package Quantity=10, Temperature Coefficient=100ppm/°C, Tolerance=1%, Voltage Rating=150V, Case/Package=0805, Composition="Thick Film", Contact Plating=Tin, Depth=1.25mm, Features="Automotive AEC-Q200", Height=0.45mm, Lead Free="Lead Free", Length=2mm, Military Standard=Not, Mount="Surface Mount", Number of Terminations=2, Packaging="Tape and Reel", PN=CRCW0805220RFKEA, Power Rating=125mW, Radiation Hardening=No, Resistance=220R, Termination=SMD/SMT, Voltage Rating (DC)=150V, Weight=0.000194oz, Width=0.049inch
R5 R6 R7 R8 R9 R10 R11 R12: library part CMP-1659-00013-4, "Chip Resistor, 10 KOhm, +/- 1%, 0.125 W, -55 to 155 degC, 0805 (2012 Metric), RoHS, Tape and Reel. / RC0805FR-0710KL", Manufacturer=Yageo, Max Operating Temperature="155 degC", Min Operating Temperature="-55 degC", Package Quantity=5000, Voltage Rating="150 V", ComponentLink1Description="Manufacturer URL", ComponentLink1URL=http://www.yageo.com/, ComponentLink2Description=Datasheet, ComponentLink2URL=http://www.yageo.com/documents/recent/PYu-RC_Group_51_RoHS_L_04.pdf, DatasheetVersion="Rev. 4, 02/2016", Height="0.5 mm", Length="2 mm", Mount="Surface Mount", Mounting Technology="Surface Mount", PackageDescription="2-Pin Surface Mounted Device, Body 2 x 1.25 mm", PackageReference=0805, Packaging="Tape and Reel", Pins=2, PN=RC0805FR-0710KL, REACH SVHC="No SVHC", RoHSCompliant=true
S1 S2 S3 S4 S5 S6 S7 S8 S9 S10 S11 S12 S13 S14 S15 S16 S17 S18 S19 S20 S21 S22 S23 S24 S25 S26 S27 S28 S29 S30: "Two button switches to match silicon buttons for keyboard"
SB0 SB1 SB2: "Normally open solder bridge"
U1: library part CMP-0186-00081-2, "16-Bit I/O Expander with Serial Interface, 28-Pin SPDIP, Extended Temperature", ComponentLink1Description="Manufacturer URL", ComponentLink1URL=http://www.microchip.com/, ComponentLink2Description=Datasheet, ComponentLink2URL=http://ww1.microchip.com/downloads/en/DeviceDoc/21952b.pdf, ComponentLink3Description="Package Specification", ComponentLink3URL=http://www.microchip.com/stellent/groups/techpub_sg/documents/packagingspec/en012702.pdf, DatasheetVersion="revB, Feb-2007", PackageDescription="28-Lead Skinny Plastic Dual In-Line (SP) - 300 mil Body [SPDIP]", PackageReference=SPDIP300-SP28, PackageVersion="revBB, Aug-2009", RevisionNote="URLs added."

## Via types
v1: diameter 30, hole 15, Top Layer to Bottom Layer, 123 vias
v2: diameter 60, hole 30, Top Layer to Bottom Layer, tented top, 9 vias

## Nets (pads, with @x,y where several pads share a name; then routed paths per layer and width w, separated by ;. In a path a pad name is that pad's centre, name@x,y a point inside that pad or via, vN(x,y) a via of type N, cw(c..) or ccw(c..) an arc to the next point about the centre after c; other vN are vias at no path point)
5V: C31.1 J1.2 J2.2 R3.2 R5.2 R6.2 SB0.2 SB1.2 SB2.2 U1.9 | length 11495.9
  Top Layer w50: J1.2@870,7730 870,7750 910,7790 913.72,7790 920.94,7797.22 1019.06,7797.22 1026.28,7790 v2(6210,7790) 9083.72,7790 9110.94,7817.22 9209.06,7817.22 9227.22,7799.06 9227.22,7788.85 9256.07,7760 J2.2@9259.7,7760
  Bottom Layer w20: SB0.2@5110,6900 5120,6890 5290,6890 SB1.2@5300,6900 5310,6890 5480,6890 SB2.2@5490,6900 5500,6890 5570,6890 5724.57,6735.43 5724.57,6600 ; R3.2@5670,6545.43 5724.57,6600 ; U1.9@6130,6650 6143.58,6636.42 C31.1@6290,6636.42 ; 6210,6804.47 6084.47,6804.47 5880,6600 5724.57,6600
  Bottom Layer w50: U1.9@6130,6650 6210,6730 6210,6804.47 v2(6210,7790) 6214.57,7785.43 R6.2@6320,7785.43 R5.2@6410,7785.43
5V_LED: C1.1 C2.1 C3.1 C4.1 C5.1 C6.1 C7.1 C8.1 C9.1 C10.1 C11.1 C12.1 C13.1 C14.1 C15.1 C16.1 C17.1 C18.1 C19.1 C20.1 C21.1 C22.1 C23.1 C24.1 C25.1 C26.1 C27.1 C28.1 C29.1 C30.1 J1.1 J2.1 LED1.1 LED2.1 LED3.1 LED4.1 LED5.1 LED6.1 LED7.1 LED8.1 LED9.1 LED10.1 LED11.1 LED12.1 LED13.1 LED14.1 LED15.1 LED16.1 LED17.1 LED18.1 LED19.1 LED20.1 LED21.1 LED22.1 LED23.1 LED24.1 LED25.1 LED26.1 LED27.1 LED28.1 LED29.1 LED30.1 | length 38004
  Top Layer w20: C2.1@66.42,2730 66.42,2896.42 LED2.1@128,2958 ; LED2.1@132,2954.01 210,3032.01 v1(210,3290) ; C1.1@576.42,80 640,143.58 LED1.1@640,257.01 ; C3.1@577.53,5960 630,6012.47 LED3.1@630,6150 ; v1(601.37,6212.87) 635,6179.24 LED3.1@635,6154.01 ; LED1.1@635,257.01 710.52,332.53 v1(717.23,332.53) ; C5.1@1068.64,2730 1130,2791.36 LED5.1@1130,2954.01 ; LED5.1@1132,2954.01 1284.02,3106.03 v1(1284.02,3248.79) ; C4.1@1576.42,80 1640,143.58 LED4.1@1640,257.01 ; C6.1@1577.53,5960 1630,6012.47 LED6.1@1630,6150 ; v1(1601.37,6212.87) 1635,6179.24 LED6.1@1635,6154.01 ; LED4.1@1635,257.01 1700.23,322.24 v1(1721.19,322.24) ; C8.1@2066.42,2720 2130,2783.58 LED8.1@2130,2950 ; LED8.1@2132,2956.01 2200,3024.01 v1(2200,3250) ; C7.1@2576.42,80 2640,143.58 LED7.1@2640,257.01 ; C9.1@2578.64,5960 2640,6021.36 LED9.1@2640,6150 ; v1(2601.37,6212.87) 2635,6179.24 LED9.1@2635,6154.01 ; LED7.1@2635,257.01 2702.71,324.71 v1(2710.57,324.71) ; C11.1@3073.08,2730 3073.08,2893.08 LED11.1@3130,2950 ; v1(3080,3250) 3080,3006.01 LED11.1@3132,2954.01 ; C10.1@3576.42,80 3576.42,196.42 LED10.1@3630,250 ; C12.1@3579.75,5960 3640,6020.25 LED12.1@3640,6150 ; v1(3601.37,6212.87) 3635,6179.24 LED12.1@3635,6154.01 ; LED10.1@3635,257.01 3697.99,320 v1(3730,320) ; C14.1@4075.31,2730 4130,2784.69 LED14.1@4130,2950 ; v1(4080,3250) 4080,3006.01 LED14.1@4132,2954.01 ; C13.1@4576.42,80 4640,143.58 LED13.1@4640,257.01 ; C15.1@4580.86,5960 4580.86,6090.86 LED15.1@4640,6150 ; v1(4601.37,6212.87) 4635,6179.24 LED15.1@4635,6154.01 ; LED13.1@4635,257.01 4700.72,322.72 v1(4712,322.72) ; C17.1@5077.53,2730 5130,2782.47 LED17.1@5130,2950 ; v1(5090,3250) 5090,2996.01 LED17.1@5132,2954.01 ; C16.1@5576.42,80 5630,133.58 LED16.1@5630,250 ; C18.1@5581.97,5960 5640,6018.03 LED18.1@5640,6160 ; LED16.1@5635,257.01 5687.99,310 v1(5720,310) ; LED18.1@5635,6154.01 5635,6179.24 5580,6234.24 5580,6320 5610,6350 v1(5742.83,6350) ; C20.1@6079.75,2730 6140,2790.25 LED20.1@6140,2950 ; v1(6090,3240) 6090,2996.01 LED20.1@6132,2954.01 ; C19.1@6576.42,80 6640,143.58 LED19.1@6640,250 ; C21.1@6583.08,5960 6630,6006.92 LED21.1@6630,6150 ; v1(6601.37,6212.87) 6635,6179.24 LED21.1@6635,6154.01 ; LED19.1@6635,257.01 6693.8,315.81 v1(6707.23,315.81) ; v1(7081.55,3239.53) 7081.55,3004.46 LED23.1@7132,2954.01 ; C23.1@7081.97,2730 7130,2778.03 LED23.1@7130,2950 ; C22.1@7576.42,80 7576.42,206.42 LED22.1@7630,260 ; C24.1@7584.2,5960 7630,6005.81 LED24.1@7630,6150 ; v1(7601.37,6212.87) 7635,6179.24 LED24.1@7635,6154.01 ; LED22.1@7635,257.01 7701.32,323.33 v1(7719.81,323.33) ; C26.1@8084.19,2730 8130,2775.81 LED26.1@8130,2954.01 ; v1(8089.77,3244.52) 8089.77,2996.24 LED26.1@8132,2954.01 ; C25.1@8576.42,80 8630,133.58 LED25.1@8630,257.01 ; C27.1@8585.31,5960 8630,6004.69 LED27.1@8630,6150 ; v1(8601.37,6212.87) 8635,6179.24 LED27.1@8635,6154.01 ; LED25.1@8635,257.01 8697.02,319.02 v1(8709.94,319.02) ; C29.1@9086.42,2730 9130,2773.58 LED29.1@9130,2950 ; LED29.1@9132,2954.01 9090,2996.01 9090,3190 9150,3250 v1(9160,3250) ; v1(9567.99,328.41) 9591.59,328.41 9635,285 LED28.1@9635,257.01 ; C28.1@9576.42,80 9630,133.58 LED28.1@9630,257.01 ; C30.1@9586.42,5960 9640,6013.58 LED30.1@9640,6150 ; v1(9601.37,6212.87) 9635,6179.24 LED30.1@9635,6154.01
  Top Layer w50: v2(520,2640) 520,3005.15 641.89,3127.04 641.89,3229.73 640,3231.62 v2(640,3290) ; v2(670,5600) 760,5690 760,6140 v2(770,6150) ; J1.1@970,7730 990,7710 9120,7710 J2.1@9160,7750 ; v2(7910,5560) v2(7910,6200) ; v2(8420,2727.71) 8420.77,2728.48 8420.77,3336 v2(8424.77,3340)
  Bottom Layer w50: -110,3403.35 -110,4220 60,4390 410,4390 540,4520 540,5470 v2(670,5600) ; 406,464.74 406,2046 520,2160 v2(520,2640) ; v2(640,3290) v2@660,3290 ; 880,6342.75 887.11,6349.86 887.11,7647.11 J1.1@982.06,7742.06 ; 5360,6200 5360,6210 5492.42,6077.58 6286,6077.58 6286,6161.29 ; v2(7910,5560) 8170,5300 8500,5300 8570,5230 8570,4480 8640,4410 8990,4410 9180,4220 9180,3427.01 ; v2(7910,6200) 7940,6200 ; v2(8420,2727.71) 8420,2330 8720,2030 9210,2030 9240,2000 9240,1830 9300,1770 9578.68,1770 9640,1708.68 9640,447.24 ; 8920,6360.32 8930,6370.32 8930,7520 J2.1@9160,7750
C0: S1.1 S1.3 S2.1 S2.3 S3.1 S3.3 U1.21 | length 12389.5
  Top Layer w16: S1.3@679.17,780.63 S1.1@679.17,1056.22 679.17,1150.83 470,1360 470,2470 300,2640 50,2640 30,2660 30,3302 176.17,3448.17 S2.3@176.17,3537.63 S2.1@176.17,3813.22 176.17,4195.24 520,4539.07 520,5840 540,5860 540,6441.78 679.17,6580.94 S3.3@679.17,6677.63 S3.1@679.17,6953.22 917.95,7192 5554.06,7192 5733.17,7012.89 5733.17,6896.7 5730,6893.53 5730,6850 U1.21@5830,6750
C1: S4.1 S4.3 S5.1 S5.3 S6.1 S6.3 U1.22 | length 11411.7
  Top Layer w16: S4.3@1679.17,780.63 S4.1@1679.17,1056.22 1679.17,1180.83 1490,1370 1490,2580 1430,2640 1050,2640 1030,2660 1030,3302 1176.17,3448.17 S5.3@1176.17,3537.63 S5.1@1176.17,3813.22 1176.17,4206.17 1490,4520 1490,5879.25 1544.04,5933.28 1544.04,6445.82 1679.17,6580.94 S6.3@1679.17,6677.63 S6.1@1679.17,6953.22 1884.94,7159 v1(4870.59,7159) ; v1(4940,7223.2) 4949.2,7214 4960,7214 5563.17,7214 5755.17,7022.01 5755.17,6924.83 U1.22@5830,6850
  Bottom Layer w16: v1(4870.59,7159) 4870.59,7157.43 4870,7158.02 4870,7160 4876.8,7160 v1(4940,7223.2)